# Altium PCB ECE362_BuckV2.PcbDoc (part 1 of 2)
Units mm, origin at the board's own origin, x right, y up, seen from the top; angles counter-clockwise.
Board outline 100 x 80 mm, 4 copper layers (Top Layer, GND, Power, Bottom Layer), stack 1.586 mm thick; 122 components, 85 nets, 403 pads, 248 vias.
Unrouted connection lines stored in the file: 1.
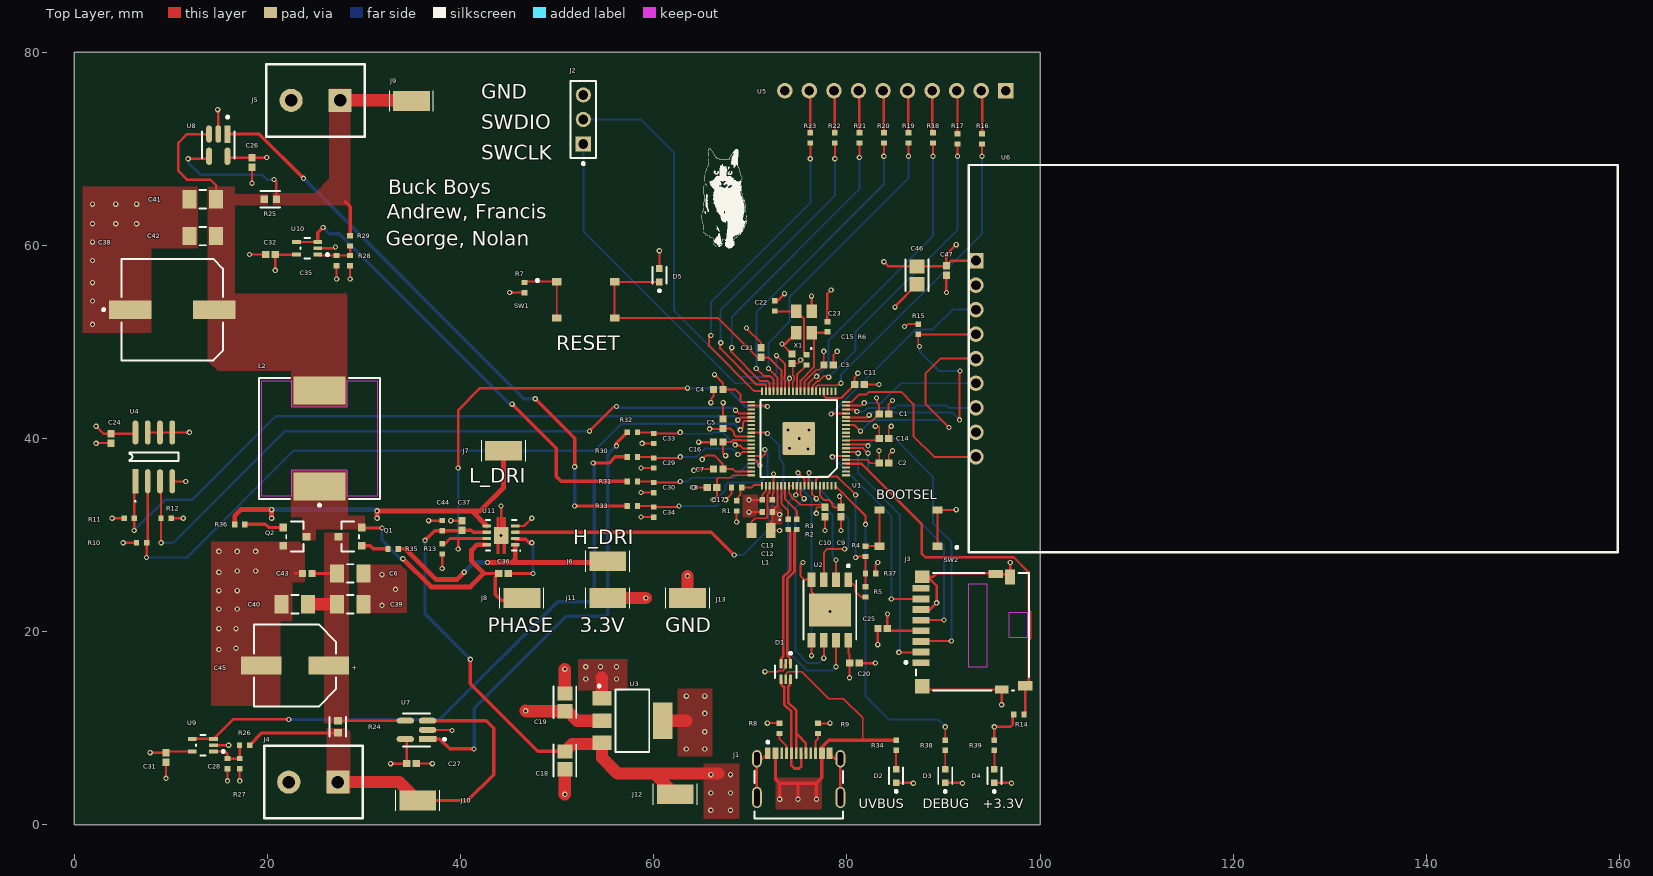
[diagram p0: Top Layer view]
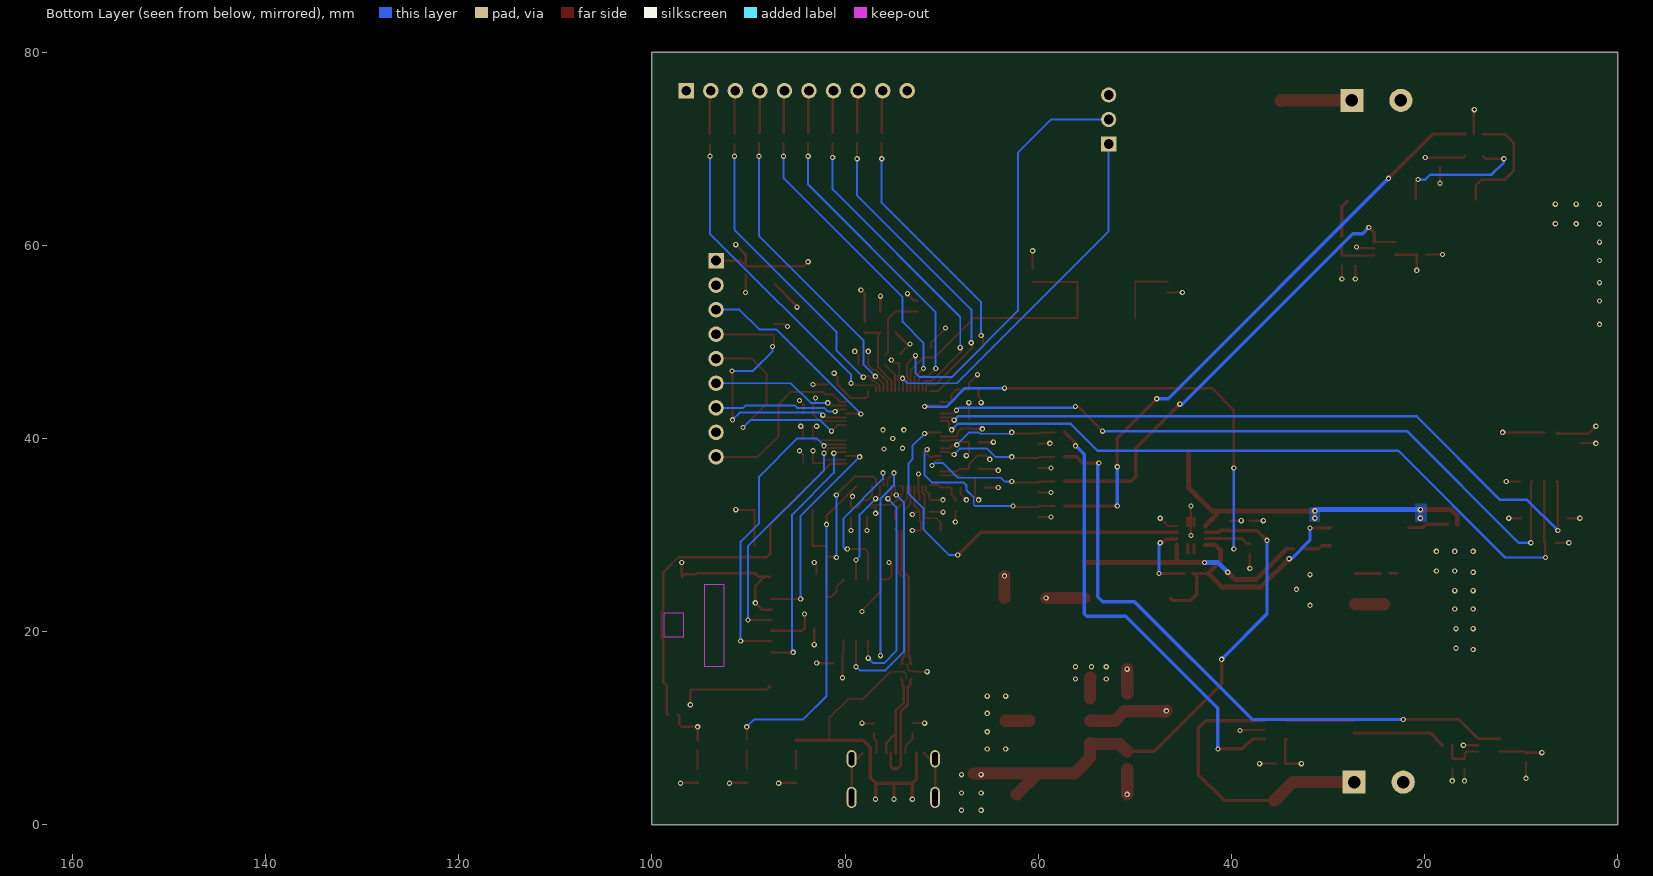
[diagram p1: Bottom Layer view, seen from below]
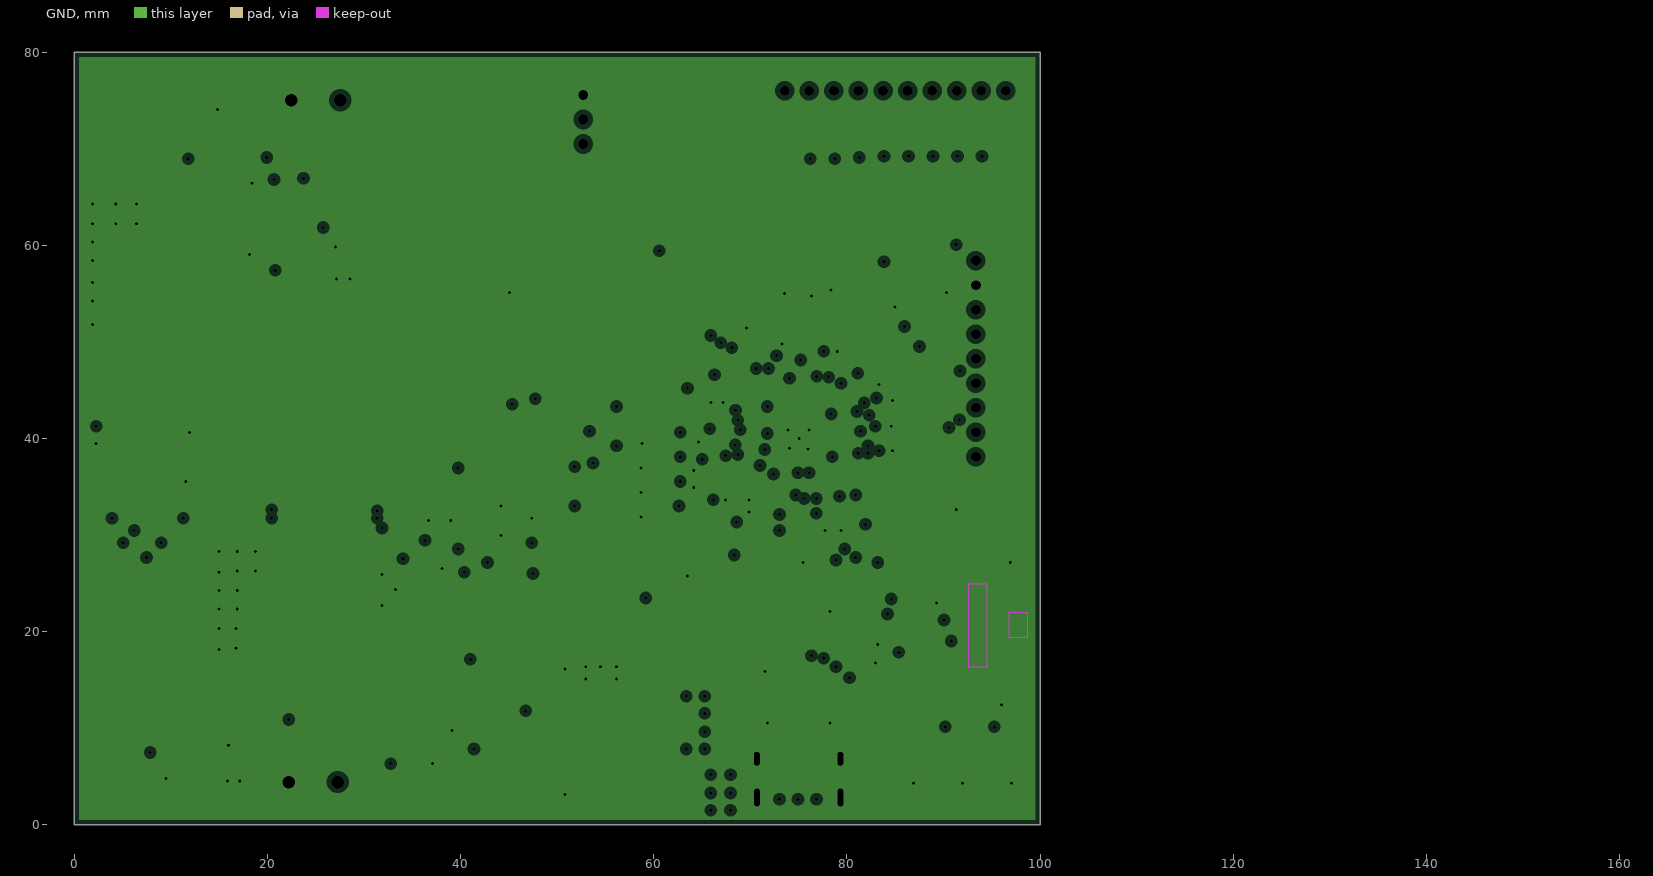
[diagram p2: GND, clearances drawn from the general rule]
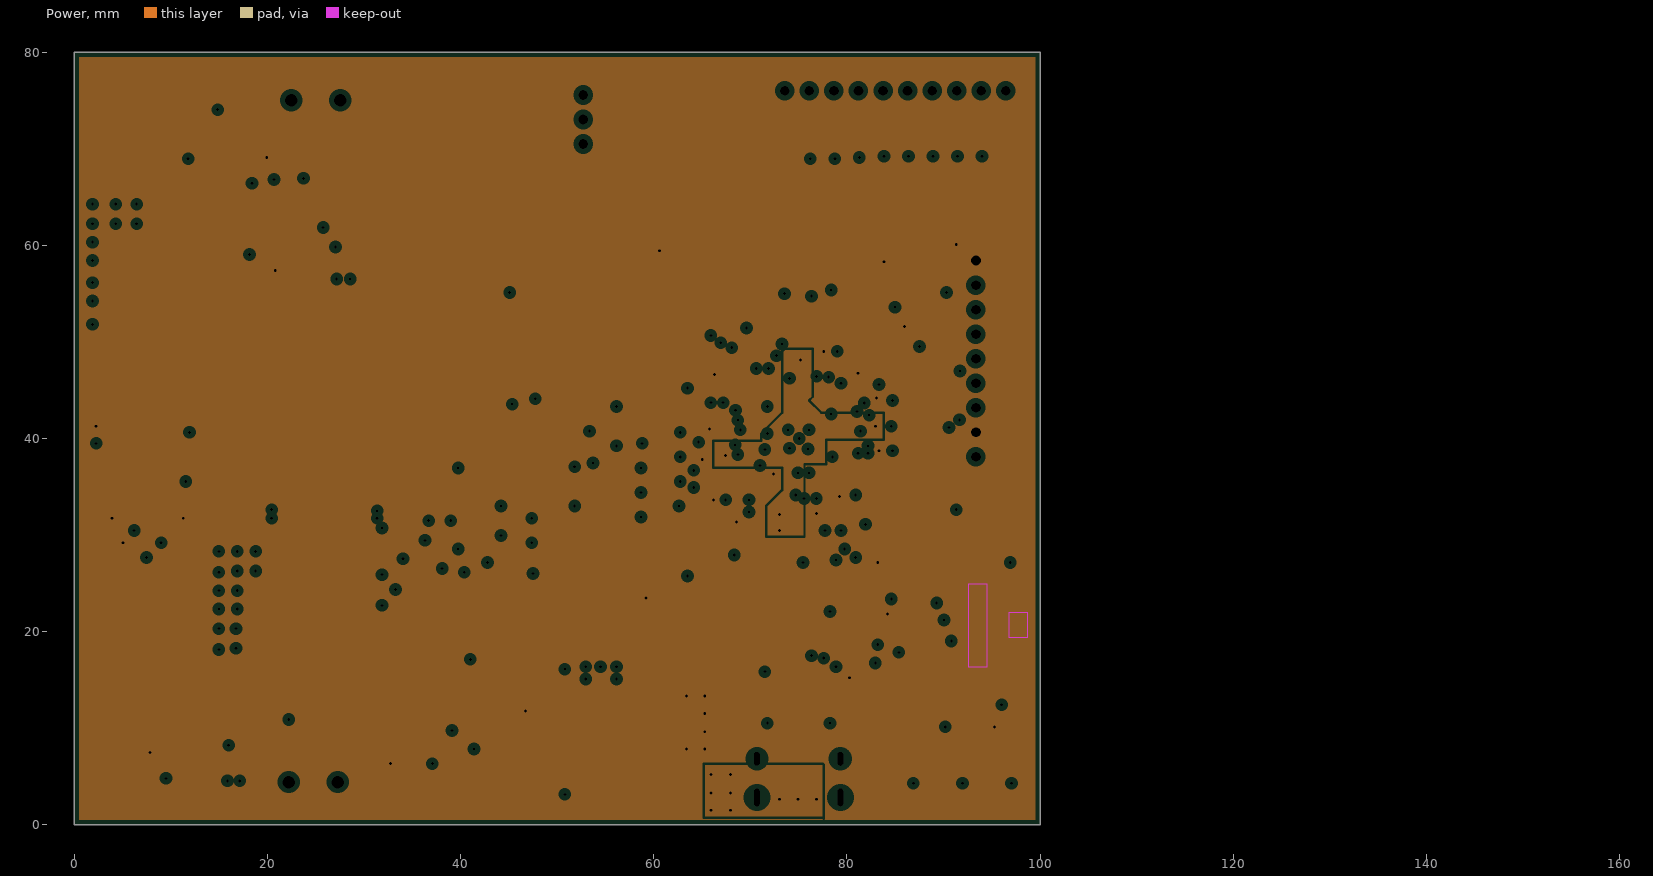
[diagram p3: Power, clearances drawn from the general rule]

## Layer stack, top to bottom
Top Solder: solder mask 0.0102, Solder Resist, Dk 3.5
Top Layer: signal copper 0.035
Dielectric 2: prepreg 0.2104, PP-006, Dk 4.4
GND: plane copper 0.0152, net GND
Dielectric 1: dielectric 1.065, FR-4, Dk 4.6
Power: plane copper 0.0152, net (Multiple Nets)
Dielectric 3: prepreg 0.2104, PP-006, Dk 4.4
Bottom Layer: signal copper 0.035
Bottom Solder: solder mask 0.0102, Solder Resist, Dk 3.5

## Board outline
0,0 0,80 100,80 100,0

## Design rules (kind name [scope] priority, off if disabled: settings)
Clearance [All] p1: gap=0.127 ignorepadtopadclearanceinfootprint=FALSE
ComponentClearance [All] p1: gap=0.127 collisioncheckmode=3 verticalgap=0.127 showdistances=FALSE
DiffPairsRouting [All] p1: maxlimit=0.152 minlimit=0.152 mostfreqgap=0.152 toplayer_minwidth=0.272 toplayer_maxwidth=0.272 toplayer_prefwidth=0.272 bottomlayer_minwidth=0.272 bottomlayer_maxwidth=0.272 bottomlayer_prefwidth=0.272 impedanceprofiledriven=TRUE impedanceprofileid={1B2B121F-581C-4ED9-ADDA-F08EA2B8F4BE} impedanceprofilevalue=90.000000 maxuncoupledlength=12.7
MinimumSolderMaskSliver [All] p1: minsoldermaskwidth=0
PlaneClearance [All] p1: clearance=0.508
PlaneConnect [All] p1: planeconnectstyle=Relief reliefexpansion=0.508 reliefentries=4 reliefconductorwidth=0.254 reliefairgap=0.254
PolygonConnect [All] p1: connectstyle=Direct reliefconductorwidth=0.254 reliefentries=4 polygonreliefangle="90 Angle" airgapwidth=0.254
RoutingVias [All] p1: holewidth=0.3 width=0.55 viastyle="Through Hole" minholewidth=0.3 minwidth=0.55 maxholewidth=0.3 maxwidth=0.55
SilkToSilkClearance [All] p1: silktosilkclearance=0
SilkToSolderMaskClearance [IsPad] p1: minsilkscreentomaskgap=0.127 clearancetoexposedcopper=TRUE
SolderMaskExpansion [All] p1: expansion=0 istentingtop=FALSE
SupplyNets "Schematic Supply Nets_5" [InNet('VOUT')] p1: voltage=0.000
SupplyNets "Schematic Supply Nets_4" [InNet('+1.1V')] p2: voltage=0.000
SupplyNets "Schematic Supply Nets_3" [InNet('VIN')] p3: voltage=0.000
SupplyNets "Schematic Supply Nets_2" [InNet('+3.3V')] p4: voltage=0.000
SupplyNets "Schematic Supply Nets_1" [InNet('GND')] p5: voltage=0.000
SupplyNets "Schematic Supply Nets" [InNet('UVBUS')] p6: voltage=0.000
Width [All] p1: maxlimit=1.27 minlimit=0.152 preferedwidth=0.203 minimp=50.000000 maximp=50.000000 favimp=50.000000
23 further rules are at their usual default settings.

## Classes and differential pairs
net class Power: 3.3V_AVDD +1.1V +3.3V NetC6_2 NetC38_2 PHASE VIN VOUT
component class S6: C20 C24 C25 C46 C47 J3 R5 R10 R11 R12 R14 R15 R37 U2 U4 U6
component class S5: C6 C26 C27 C28 C29 C30 C31 C32 C33 C34 C35 C36 C37 C38 C39 C40 C41 C42 C43 C44 C45 J4 J5 J6 J7 J8 J9 J10 L2 Q1 Q2 R13 R24 R25 R26 R27 R28 R29 R30 R31 R32 R33 R35 R36 U7 U8 U9 U10 U11
component class S4: C1 C2 C3 C4 C5 C7 C8 C9 C10 C11 C14 C15 C16 C18 C19 U3
component class S3: R16 R17 R18 R19 R20 R21 R22 R23 U5
component class S2: D1 D2 D3 D4 D5 J1 J2 J11 J12 J13 R4 R7 R8 R9 R34 R38 R39 SW1 SW2
component class S1: C12 C13 C17 C21 C22 C23 L1 R1 R2 R3 R6 U1 X1
differential pair USB_DX: +USB_DX_P -USB_DX_N
differential pair USB_D: +USB_D_P -USB_D_N

## Components (designator, comment, footprint, x,y, rotation, side; value= is the part's Value field where it differs from the comment)
C1 "CL05B104KO5NNNC" CAPC1050X55X23ML05T13 83.82,42.545 r180 top
C2 "CL05B104KO5NNNC" CAPC1050X55X23ML05T13 83.82,37.465 r180 top
C3 "CL05B104KO5NNNC" CAPC1050X55X23ML05T13 78.105,47.625 r180 top
C4 "CL05B104KO5NNNC" CAPC1050X55X23ML05T13 66.675,45.085 r0 top
C5 "CL05B104KO5NNNC" CAPC1050X55X23ML05T13 67.183,41.529 r270 top
C6 "GRM31CC81E226ME11L" FP-GRM31C-0_3-e0_3_0_8-IPC_B 28.575,26.035 r180 top
C7 "CL05B104KO5NNNC" CAPC1050X55X23ML05T13 66.675,36.83 r0 top
C8 "CL05B104KO5NNNC" CAPC1050X55X23ML05T13 66.04,34.925 r0 top
C9 "CL05B104KO5NNNC" CAPC1050X55X23ML05T13 79.375,32.385 r90 top
C10 "CL05B104KO5NNNC" CAPC1050X55X23ML05T13 77.724,32.385 r90 top
C11 "CL05B104KO5NNNC" CAPC1050X55X23ML05T13 81.28,45.593 r180 top
C12 "4.7uF" "0402 Resistor" 71.755,32.385 r0 top
C13 "4.7uF" "0402 Resistor" 71.755,33.655 r0 top
C14 "CL05B104KO5NNNC" CAPC1050X55X23ML05T13 83.82,40.005 r180 top
C15 "CL05B104KO5NNNC" CAPC1050X55X23ML05T13 74.295,48.26 r270 top
C16 "CL05B104KO5NNNC" CAPC1050X55X23ML05T13 66.675,39.624 r0 top
C17 "4.7uF" "0402 Resistor" 68.58,34.925 r0 top
C18 "CL21A106KAYNNNE" FP-CL21-IPC_A 50.8,6.694 r270 top
C19 "CL21A106KAYNNNE" FP-CL21-IPC_A 50.8,12.7 r90 top
C20 "CL05B104KO5NNNC" CAPC1050X55X23ML05T13 80.772,16.764 r180 top
C21 "CL05B104KO5NNNC" CAPC1050X55X23ML05T13 71.12,48.895 r270 top
C22 "CL05C150JB5NNNC" "0402 Resistor" 72.517,53.721 r270 top
C23 "CL05C150JB5NNNC" "0402 Resistor" 77.978,51.562 r270 top
C24 "CL05B104KO5NNNC" CAPC1050X55X23ML05T13 3.81,40.005 r90 top
C25 "CL05B104KO5NNNC" CAPC1050X55X23ML05T13 83.693,20.32 r0 top
C26 "CL05B104KO5NNNC" CAPC1050X55X23ML05T13 18.415,68.58 r90 top
C27 "CL05B104KO5NNNC" CAPC1050X55X23ML05T13 34.925,6.35 r180 top
C28 "CC0402KRX7R6BB222" "0402 Resistor" 15.875,6.35 r90 top
C29 "CC0402KRX7R6BB222" "0402 Resistor" 60,37.465 r90 top
C30 "CC0402KRX7R6BB222" "0402 Resistor" 60,34.925 r90 top
C31 "CL05B104KO5NNNC" CAPC1050X55X23ML05T13 9.525,6.985 r90 top
C32 "CL05B104KO5NNNC" CAPC1050X55X23ML05T13 20.32,59.055 r0 top
C33 "CC0402KRX7R6BB222" "0402 Resistor" 60,40.005 r90 top
C34 "CC0402KRX7R6BB222" "0402 Resistor" 60,32.385 r90 top
C35 "CC0402KRX7R6BB222" "0402 Resistor" 27.178,58.42 r90 top
C36 "CL05B104KO5NNNC" CAPC1050X55X23ML05T13 44.45,26.035 r180 top
C37 "CL05B104KO5NNNC" CAPC1050X55X23ML05T13 40.132,30.988 r270 top
C38 "6SVPA470M" FP-OS-CON-SMT-F8-MFG 10.16,53.34 r0 top
C39 "GRM31CC81E226ME11L" FP-GRM31C-0_3-e0_3_0_8-IPC_B 28.575,22.86 r180 top
C40 "GRM31CC81E226ME11L" FP-GRM31C-0_3-e0_3_0_8-IPC_B 22.86,22.86 r0 top
C41 "GRM31CC81E226ME11L" FP-GRM31C-0_3-e0_3_0_8-IPC_B 13.335,64.77 r0 top
C42 "GRM31CC81E226ME11L" FP-GRM31C-0_3-e0_3_0_8-IPC_B 13.335,60.96 r0 top
C43 "CL05B104KO5NNNC" CAPC1050X55X23ML05T13 24.13,26.035 r0 top
C44 "4.7uF" "0402 Resistor" 38.1,30.988 r270 top
C45 "865060653010" WCAP-ASLL_D8H10.5 22.86,16.51 r0 top
C46 "CL21A106KAYNNNE" FP-CL21-IPC_A 87.249,56.896 r270 top
C47 "CL05B104KO5NNNC" CAPC1050X55X23ML05T13 90.297,57.404 r90 top
D1 "USBLC6-2P6" FP-SOT-666-MFG 73.66,15.875 r270 top
D2 "LSM0603453V" FP-LSM0603453V-MFG 85.09,5.08 r90 top
D3 "LSM0603453V" FP-LSM0603453V-MFG 90.17,5.08 r90 top
D4 "LSM0603453V" FP-LSM0603453V-MFG 95.25,5.08 r90 top
D5 "LSM0603453V" FP-LSM0603453V-MFG 60.579,56.896 r90 top
J1 "217179-0001" FP-2171790001-MFG 75,4 r0 top
J2 "TSW-103-22-G-S" FP-TSW-103-22-G-S-MFG 52.705,73.025 r90 top
J3 "1140084168" FP-1140084168-0 93,20 r270 top
J4 "DG127-5.08-02P-14-02A(H)" "DEGSON DG127-5.08-02P-14-02A(H)" 24.765,4.445 r180 top
J5 "DG127-5.08-02P-14-02A(H)" "DEGSON DG127-5.08-02P-14-02A(H)" 25,75 r180 top
J6 "5019" 5019_MFG 55.245,27.305 r0 top
J7 "5019" 5019_MFG 44.45,38.735 r0 top
J8 "5019" 5019_MFG 46.355,23.495 r0 top
J9 "5019" 5019_MFG 34.925,74.93 r0 top
J10 "5019" 5019_MFG 35.56,2.54 r0 top
J11 "5019" 5019_MFG 55.245,23.495 r0 top
J12 "5019" 5019_MFG 62.23,3.175 r0 top
J13 "5019" 5019_MFG 63.5,23.495 r0 top
L1 "AOTA-B201610S3R3-101-T" AOTA-B201610S3R3-101-T 71.12,30.48 r0 top
L2 "7447709221" WE-PD_1210 25.4,40.005 r0 top
Q1 "AO3400A" FP-SOT23-MFG 28.575,29.845 r180 top
Q2 "AO3400A" FP-SOT23-MFG 22.86,29.845 r0 top
R1 "33R" "0402 Resistor" 68.58,33.02 r270 top
R2 "FRC0402F27R0TS" "0402 Resistor" 74.803,31.115 r270 top
R3 "FRC0402F27R0TS" "0402 Resistor" 73.914,31.115 r270 top
R4 "FRC0402F1001TS" "0402 Resistor" 81.915,28.321 r270 top
R5 "FRC0402F0000TS" "0402 Resistor" 81.915,24.13 r90 top
R6 "FRC0402F1001TS" "0402 Resistor" 75.819,48.133 r270 top
R7 "FRC0402F1001TS" "0402 Resistor" 46.609,55.626 r90 top
R8 "FRC0402F5101TS" "0402 Resistor" 73,10 r90 top
R9 "FRC0402F5101TS" "0402 Resistor" 77,10 r90 top
R10 "FRC0402F4701TS" "0402 Resistor" 6.985,29.21 r180 top
R11 "FRC0402F4701TS" "0402 Resistor" 5.715,31.75 r180 top
R12 "FRC0402F1002TS" "0402 Resistor" 9.525,31.75 r0 top
R13 "FRC0402F3302TS" "0402 Resistor" 38.1,28.575 r90 top
R14 "FRC0402F1002TS" "0402 Resistor" 97.79,11.43 r0 top
R15 "FRC0402F1002TS" "0402 Resistor" 87.376,51.308 r90 top
R16 "FRC0402F1001TS" "0402 Resistor" 93.98,71.01 r270 top
R17 "FRC0402F1001TS" "0402 Resistor" 91.44,71.01 r270 top
R18 "FRC0402F1001TS" "0402 Resistor" 88.9,71.12 r270 top
R19 "FRC0402F1001TS" "0402 Resistor" 86.36,71.12 r270 top
R20 "FRC0402F1001TS" "0402 Resistor" 83.82,71.12 r270 top
R21 "FRC0402F1001TS" "0402 Resistor" 81.28,71.12 r270 top
R22 "FRC0402F1001TS" "0402 Resistor" 78.74,71.12 r270 top
R23 "FRC0402F1001TS" "0402 Resistor" 76.2,71.12 r270 top
R24 "CSR0603FK20L0" FP-CSR0603-IPC_C 27.305,10.16 r90 top
R25 "CSR0603FK20L0" FP-CSR0603-IPC_C 20.32,64.77 r0 top
R26 "FRC0402F1003TS" "0402 Resistor" 17.653,8.255 r180 top
R27 "FRC0402F3302TS" "0402 Resistor" 17.145,6.35 r90 top
R28 "FRC0402F3302TS" "0402 Resistor" 28.575,58.42 r90 top
R29 "FRC0402F2202TS" "0402 Resistor" 28.575,60.452 r90 top
R30 "FRC0402F1000TS" "0402 Resistor" 57.785,38.1 r0 top
R31 "FRC0402F1000TS" "0402 Resistor" 57.785,35.56 r0 top
R32 "FRC0402F1000TS" "0402 Resistor" 57.785,40.64 r0 top
R33 "FRC0402F1000TS" "0402 Resistor" 57.785,33.02 r0 top
R34 "FRC0402F1001TS" "0402 Resistor" 85.09,8.255 r90 top
R35 "FRC0402F0000TS" "0402 Resistor" 33.02,28.575 r0 top
R36 "FRC0402F0000TS" "0402 Resistor" 17.145,31.115 r180 top
R37 "FRC0402F1002TS" "0402 Resistor" 82.44,26.035 r0 top
R38 "FRC0402F1001TS" "0402 Resistor" 90.17,8.255 r90 top
R39 "FRC0402F1001TS" "0402 Resistor" 95.25,8.255 r90 top
SW1 "XKB Connection TS-1187A-B-A-B" Push_Button 52.959,54.356 r0 top
SW2 "XKB Connection TS-1187A-B-A-B" Push_Button 86.36,30.734 r180 top
U1 "RP2350B" QFN-80 75,40 r180 top locked
U2 "W25Q64JVZPIQ" FP-ZP-MFG 78.232,22.25 r270 top
U3 "NCP1117ST33T3G" ONSC-SOT-223-4-318H-01_A_V 57.785,10.795 r0 top
U4 "TMP75CQDRQ1" TMP75CQDRQ1 8.255,38.1 r90 top
U5 "ECE 362 Keypad" "ECE 362 Keypad" 85,76 r180 top
U6 "2.2 TFT SPI 240X320" "TFT 2.2 LCD Display" 93.345,48.26 r270 top
U7 "INA180A1IDBVR" FP-DBV0005A-IPC_A 35.44,9.845 r180 top
U8 "INA180A3IDBVR" FP-DBV0005A-IPC_A 14.92,70.365 r270 top
U9 "TLV9001IDCKR" FP-DCK0005A-MFG 13.335,8.255 r180 top
U10 "TLV9001IDCKR" FP-DCK0005A-MFG 24.13,59.69 r180 top
U11 "TPS28225DRBR" DRB0008A_V 44.196,29.972 r180 top
X1 "12MHz" "ABRACON ABM8-272-T3" 75.565,52.07 r90 top

## Footprints (in the part's own frame and the unit in brackets; to place one, negate y for a bottom-side part, rotate by r counter-clockwise, add the part's x,y. Pads: shape width x height; smd on the part's side, far side on the other; paste and mask are expansions set on the pad)
"0402 Resistor" [mm] "0402 Thick Film"
  rect 0.55x0.6 smd mask+0.05: 1(-0.525,0) 2(0.525,0)
5019_MFG [mm] "Recommended Land Pattern"
  rect 3.8x2.03 smd paste+0 mask+0: 1(0,0)
  silkscreen extent -2.27,-1.08 2.27,1.08, body extent -1.91,-1.01 1.91,1.01, height 2.42
"ABRACON ABM8-272-T3" [mm] "Ultra Miniature Ceramic SMD Crystal"
  rect 1.4x1.1 smd mask+0.05: 1(-1.1,-0.8) 2(1.1,-0.8) 3(1.1,0.8) 4(-1.1,0.8)
  silkscreen extent -2.76,-0.76 -2.74,-0.74
AOTA-B201610S3R3-101-T [mm] "3.3uH Inductor for the RP2350"
  rect 1x1.6 smd mask+0.05: 1(1,0) 2(-1,0)
  silkscreen extent 1.9,1.1 1.9,1.1
CAPC1050X55X23ML05T13 [mm] "Chip Capacitor, 2-Leads, Body 1.05x0.55mm, IPC Low Density"
  rect 0.76x0.72 smd: 1(-0.49,0) 2(0.49,0)
  body extent -0.53,-0.28 0.53,0.27, height 0.55
"DEGSON DG127-5.08-02P-14-02A(H)" [mm]
  rect 2.4x2.4 hole 1.3 mask+0.05: 1(-2.54,0)
  round 2.4 hole 1.3 mask+0.05: 2(2.54,0)
  silkscreen extent -5.1,-3.75 5.1,3.75
DRB0008A_V [mm] "SON, 8-Leads, Body 3x3mm, Pitch 0.65mm, Thermal Pad 1.50 x 3.8mm"
  rrect29% 0.85x0.35 smd: 1(-1.475,0.975) 2(-1.475,0.325) 3(-1.475,-0.325) 4(-1.475,-0.975) 5(1.475,-0.975) 6(1.475,-0.325) 7(1.475,0.325) 8(1.475,0.975)
  rrect7% 1.5x1.75 smd: 9(0,0)
  Top Layer region: 0.185,0.875 0.185,1.9 0.465,1.9 0.465,0.875
  Top Layer region: -0.185,-0.875 -0.185,-1.9 -0.465,-1.9 -0.465,-0.875
  Top Layer region: 0.185,-0.875 0.185,-1.9 0.465,-1.9 0.465,-0.875
  Top Layer region: -0.185,0.875 -0.185,1.9 -0.465,1.9 -0.465,0.875
  silkscreen extent -2.02,-1.58 1.57,1.62, body extent -1.5,-1.5 1.5,1.5, height 1
"ECE 362 Keypad" [mm]
  rect 1.6x1.6 hole 1 mask+0.05: 1(-11.43,0)
  round 1.6 hole 1 mask+0.05: 2(-8.89,0) 3(-6.35,0) 4(-3.81,0) 5(-1.27,0) 6(1.27,0) 7(3.81,0) 8(6.35,0) 9(8.89,0) 10(11.43,0)
FP-1140084168-0 [mm]
  rect 0.7x1.75 smd paste+0 mask+0: 1(3.2,-5.35) 2(2.1,-5.35) 3(1,-5.35) 4(-0.1,-5.35) 5(-1.2,-5.35) 6(-2.3,-5.35) 7(-3.4,-5.35) 8(-4.5,-5.35)
  rect 1x1.55 smd paste+0 mask+0: 9(5.575,5.45)
  rect 1.55x1 smd paste+0 mask+0: 10(-5.675,3.875)
  rect 0.8x1.4 smd paste+0 mask+0: 11(5.975,3.025)
  rect 0.8x1.5 smd paste+0 mask+0: 12(-5.975,2.375)
  rect 1.3x1.5 smd paste+0 mask+0: 13(-5.7,-5.225)
  rect 1.5x1.5 smd paste+0 mask+0: 14(5.65,-5.225)
  Keep-Out Layer region: -1.951,3.725 0.549,3.725 0.549,5.725 -1.951,5.725
  Keep-Out Layer region: -4.9,-0.475 3.6,-0.475 3.6,1.525 -4.9,1.525
  silkscreen extent -6.1,-7.02 6.1,5.85, body extent -6.55,-6.32 6.5,6.32, height 0.25
FP-2171790001-MFG [mm]
  rrect100% 1x1.8 hole 1.4 slot 0.6 at 0 deg paste-2539.97 mask+0: 1(-4.32,2.85) 2(4.32,2.85)
  rrect100% 1x2.2 hole 1.8 slot 0.6 at 0 deg paste-2539.97 mask+0: 3(-4.32,-1.15) 4(4.32,-1.15)
  rect 0.6x1.15 smd paste+0 mask+0: A1-B12(-3.2,3.425) A4-B9(-2.4,3.425) B1-A12(3.2,3.425) B4-A9(2.4,3.425)
  rect 0.3x1.15 smd paste+0 mask+0: A5(-1.25,3.425) A6(-0.25,3.425) A7(0.25,3.425) A8(1.25,3.425) B5(1.75,3.425) B6(0.75,3.425) B7(-0.75,3.425) B8(-1.75,3.425)
  silkscreen extent -4.57,-3.35 4.57,4.7, body extent -4.92,-3.45 4.92,4.1, height 0.25
FP-CL21-IPC_A [mm]
  rect 1.455x1.556 smd paste+0 mask+0: 1(-0.926,0) 2(0.926,0)
  silkscreen extent -1.65,-1.18 1.65,1.18, body extent -2.15,-1.28 2.15,1.28, height 0.25
FP-CSR0603-IPC_C [mm]
  rect 0.758x0.812 smd paste+0 mask+0: 1(-0.627,0) 2(0.627,0)
  silkscreen extent -1.01,-0.85 1.01,0.85, body extent -1.11,-0.55 1.11,0.55, height 0.25
FP-DBV0005A-IPC_A [mm]
  rect 1.805x0.612 smd paste+0 mask+0: 1(-1.15,0.95)
  rrect100% 1.805x0.612 smd paste+0 mask+0: 2(-1.15,0) 3(-1.15,-0.95) 4(1.15,-0.95) 5(1.15,0.95)
  silkscreen extent -3.03,-1.7 1.4,1.7, body extent -2.55,-1.95 2.55,1.95, height 0.25
FP-DCK0005A-MFG [mm]
  rect 0.9x0.4 smd paste-1000 mask+0: 1(-1.1,0.65) 2(-1.1,0) 3(-1.1,-0.65) 4(1.1,-0.65) 5(1.1,0.65)
  silkscreen extent -2.23,-1.07 0.7,1.07, body extent -1.65,-1.33 1.65,1.33, height 0.25
FP-GRM31C-0_3-e0_3_0_8-IPC_B [mm]
  rect 1.453x1.904 smd paste+0 mask+0: 1(-1.375,0) 2(1.375,0)
  silkscreen extent -0.35,-0.95 0.35,0.95, body extent -2.35,-1.2 2.35,1.2, height 0.25
FP-LSM0603453V-MFG [mm]
  rect 0.7x0.7 smd paste+0 mask+0: 1(-0.7,0) 2(0.7,0)
  silkscreen extent -1.72,-0.72 0.85,0.72, body extent -1.15,-0.55 1.15,0.55, height 0.25
FP-OS-CON-SMT-F8-MFG [mm]
  rect 4.4x1.9 smd paste+0 mask+0: 1(-4.35,0) 2(4.35,0)
  silkscreen extent -7.22,-5.25 5.25,5.25, body extent -6.8,-5.5 6.8,5.5, height 0.25
FP-SOT23-MFG [mm]
  rect 0.8x0.8 smd paste+0 mask+0: 1(-1.2,0.95) 2(-1.2,-0.95) 3(1.2,0)
  silkscreen extent -0.9,-1.55 0.9,1.55, body extent -1.7,-1.78 1.7,1.78, height 0.25
FP-SOT-666-MFG [mm]
  rect 0.99x0.3 smd paste+0 mask+0: 1(-0.805,0.5) 2(-0.805,0) 3(-0.805,-0.5) 4(0.805,-0.5) 5(0.805,0) 6(0.805,0.5)
  silkscreen extent -2.02,-1.1 0.65,1.1, body extent -1.4,-0.95 1.4,0.95, height 0.25
FP-TSW-103-22-G-S-MFG [mm]
  rect 1.57x1.57 hole 1.02 paste-2539.97 mask+0: 1(-2.54,0)
  round 1.57 hole 1.02 paste-2539.97 mask+0: 2(0,0) 3(2.54,0)
  silkscreen extent -4.7,-1.34 4,1.34, body extent -4.1,-1.44 4.1,1.44, height 0.25
FP-ZP-MFG [mm]
  rect 1.5x0.8 smd paste-1000 mask+0: 1(-3.15,1.905) 2(-3.15,0.635) 3(-3.15,-0.635) 4(-3.15,-1.905) 5(3.15,-1.905) 6(3.15,-0.635) 7(3.15,0.635) 8(3.15,1.905)
  rect 3.45x4.35 smd paste+0 mask+0: 9(0,0)
  silkscreen extent -4.7,-2.73 3.05,2.73, body extent -4,-2.65 4,2.65, height 0.25
ONSC-SOT-223-4-318H-01_A_V [mm] "SOT223, 4-Leads, Body 6.5x3.5mm, Pitch 2.3mm"
  rect 2x1.5 smd: 1(-3.15,2.3) 2(-3.15,0) 3(-3.15,-2.3)
  rect 2x3.8 smd: 4(3.15,0)
  silkscreen extent -3.55,-3.25 1.75,3.72, body extent -1.75,-3.25 1.75,3.25, height 1.8
Push_Button [mm] "XKB Connection TS-1187A-B-A-B"
  rect 1x0.75 smd: 1(-3,1.875) 2(3,1.875) 3(-3,-1.875) 4(3,-1.875)
  silkscreen extent -5.13,1.87 -4.87,2.13
QFN-80 [mm]
  rect 0.78x0.22 smd mask+0.05: 1(-4.897,3.8) 2(-4.897,3.4) 3(-4.897,3) 4(-4.897,2.6) 5(-4.897,2.2) 6(-4.897,1.8) 7(-4.897,1.4) 8(-4.897,1) 9(-4.897,0.6) 10(-4.897,0.2) 11(-4.897,-0.2) 12(-4.897,-0.6) 13(-4.897,-1) 14(-4.897,-1.4) 15(-4.897,-1.8) 16(-4.897,-2.2) 17(-4.897,-2.6) 18(-4.897,-3) 19(-4.897,-3.4) 20(-4.897,-3.8) 41(4.897,-3.8) 42(4.897,-3.4) 43(4.897,-3) 44(4.897,-2.6) 45(4.897,-2.2) 46(4.897,-1.8) 47(4.897,-1.4) 48(4.897,-1) 49(4.897,-0.6) 50(4.897,-0.2) 51(4.897,0.2) 52(4.897,0.6) 53(4.897,1) 54(4.897,1.4) 55(4.897,1.8) 56(4.897,2.2) 57(4.897,2.6) 58(4.897,3) 59(4.897,3.4) 60(4.897,3.8)
  rect 0.22x0.78 smd mask+0.05: 21(-3.8,-4.897) 22(-3.4,-4.897) 23(-3,-4.897) 24(-2.6,-4.897) 25(-2.2,-4.897) 26(-1.8,-4.897) 27(-1.4,-4.897) 28(-1,-4.897) 29(-0.6,-4.897) 30(-0.2,-4.897) 31(0.2,-4.897) 32(0.6,-4.897) 33(1,-4.897) 34(1.4,-4.897) 35(1.8,-4.897) 36(2.2,-4.897) 37(2.6,-4.897) 38(3,-4.897) 39(3.4,-4.897) 40(3.8,-4.897) 61(3.8,4.897) 62(3.4,4.897) 63(3,4.897) 64(2.6,4.897) 65(2.2,4.897) 66(1.8,4.897) 67(1.4,4.897) 68(1,4.897) 69(0.6,4.897) 70(0.2,4.897) 71(-0.2,4.897) 72(-0.6,4.897) 73(-1,4.897) 74(-1.4,4.897) 75(-1.8,4.897) 76(-2.2,4.897) 77(-2.6,4.897) 78(-3,4.897) 79(-3.4,4.897) 80(-3.8,4.897)
  rrect10% 3.4x3.4 smd mask+0.05: 81(0,0)
  silkscreen extent -3.97,-3.97 3.97,3.97
"TFT 2.2 LCD Display" [mm]
  rect 1.6x1.6 hole 1 mask+0.05: 1(-10.16,0)
  round 1.6 hole 1 mask+0.05: 2(-7.62,0) 3(-5.08,0) 4(-2.54,0) 5(0,0) 6(2.54,0) 7(5.08,0) 8(7.62,0) 9(10.16,0)
  silkscreen extent -20.05,-0.75 20.05,66.45
TMP75CQDRQ1 [mm] "-40℃~+125℃ SMBus ±0.25℃ SOP-8 Analog and Digital Output"
  rect 2.5x0.6 smd mask+0.05: 1(-2.525,1.905)
  oval 2.5x0.6 smd mask+0.05: 2(-2.525,0.635) 3(-2.525,-0.635) 4(-2.525,-1.905) 5(2.525,-1.905) 6(2.525,-0.635) 7(2.525,0.635) 8(2.525,1.905)
  silkscreen extent -4.6,-2.54 0.44,2.54
WCAP-ASLL_D8H10.5 [mm] "Aluminium Electrolytic V-Chip SMT Capacitors, 8x10.5mm"
  rect 4.2x1.9 smd: 1(3.5,0) 2(-3.5,0)
  silkscreen extent -4.25,-4.25 4.25,4.25, body extent -4.5,-4.15 4.5,4.15, height 10.5
WE-PD_1210 [mm] "SMT Shielded Power Inductor, 2-leads, body 12x12mm"
  rect 5.4x2.9 smd: 1(0,-4.95) 2(0,4.95)
  Top Layer keep-out region: -6,6 -2.9,6 -2.9,3.3 2.9,3.3 2.9,6 6,6 6,-6 2.9,-6 2.9,-3.3 -2.9,-3.3 -2.9,-6 -6,-6
  silkscreen extent -6.25,-7.02 6.25,6.25, body extent -6,-6 6,6, height 9.46

## Part data
C1 C2 C3 C4 C5 C7 C8 C9 C10 C11 C14 C15 C16 C20 C21 C24 C25 C26 C27 C31 C32 C36 C37 C43 C47: library part CMP-2000-05439-1, "Chip Capacitor, 100 nF, +/- 10%, 16 V, -55 to 125 degC, 0402 (1005 Metric), RoHS, Tape and Reel", Capacitance=100nF, Case Size/Dimension=0402, Dielectric=X7R, LCSC Part #=C1525, Manufacturer="Samsung Electro-Mechanics", Rated Voltage=16V, Tolerance (%)=±10%, Datasheet=https://www.lcsc.com/datasheet/C1525.pdf, Datasheet URL=https://datasheet.ciiva.com/29198/458718-da-01-en-vs-kondensator-0402-29198423.pdf, Datasheet Version=Nov-10, Manufacturer URL=http://www.samsungsem.com/global/index.jsp
C6 C39 C40 C41 C42: library part CMP-06035-043516-1, "Chip Multilayer Ceramic Capacitors for General Purpose, 1206, 22uF, X6S, 22%, 20%, 25V", Capacitance=22uF, Dielectric=X6S, Tolerance=20%, Voltage Rating (DC)=25V, Length=3.2mm, Thickness=1.6mm, Width=1.6mm
C12 C13 C17 C44: library part CL05A475MP5NRNC, "CAP CER 4.7uF 10V X5R 0402", LCSC Part #=C23733, C=4.7uF, Datasheet=https://www.lcsc.com/datasheet/C23733.pdf
C18 C19 C46: library part CMP-13271-002975-1, "CL21 Series 0805 10uF 25V ±10% Tolerance X5R Multilayer Ceramic Chip Capacitor", Capacitance=10uF, Case Code (Imperial)=0805, Case Code (Metric)=2012, Dielectric=X5R, LCSC Part #=C15850, Max Operating Temperature=85°C, Min Operating Temperature=-55°C, Package Quantity=1, Tolerance=10%, Voltage Rating=25V, Case/Package=0805, Datasheet=https://www.lcsc.com/datasheet/C15850.pdf, Depth=1.25mm, Height=1.25mm, Length=2mm, Mount="Surface Mount", Packaging="Tape and Reel", Radiation Hardening=No, Thickness=0.057inch, Width=0.049inch
C22 C23: "CAP CER 15pF 50V C0G 0402", LCSC Part #=C86285, C=15pF
C28 C29 C30 C33 C34 C35: "CAP CER 2.2nF 10V X7R 0402", LCSC Part #=C541373, C=2.2nF
C38: library part CMP-05428-000400-1, "Conductive Polymer Aluminum Solid Capacitors (OS-CON) 470uF ±20% 6.3V RADIAL SMT 10x7.9mm", Capacitance=470uF, Case/Package=Radial, ESR (Equivalent Series Resistance)=20mR, Max Operating Temperature=105°C, Min Operating Temperature=-55°C, Package Quantity=500, Ripple Current=4.13A, Tolerance=20%, Voltage Rating=6.3V, Diameter=10mm, Dissipation Factor=12%, Height=10.3mm, Height - Seated (Max)=0.315inch, Lead Free="Lead Free", Length=7.9mm, Life (Hours)=2000Hour, Mount="Surface Mount", Packaging="Tape and Reel", Polarity=Polar, REACH SVHC="No SVHC", RoHS Compliant=Yes, Series="OS-CON, SVPA", Termination=SMD/SMT, Voltage Rating (DC)=6.3V, Width=10.3mm
C45: library part CMP-03913-54202488-3, "Alum. Electrolytic Cap 100UF 50V 10.5MMV-CHIP Wcap-asll, Lifetime 5000H +105OC", Capacitance=100µF, Case/Package=Radial, ESR (Equivalent Series Resistance)=227.529mΩ, Insulation Resistance=1MΩ, Leakage Current=50µA, Max Operating Temperature=105°C, Min Operating Temperature=-55°C, Ripple Current=350mA, Tolerance=20%, Voltage Rating=50V, Diameter=8mm, Height=10.5mm, Height - Seated (Max)=10.4902mm, Impedance=340mΩ, Length=10.5mm, Life (Hours)=5000hours, Mount="Surface Mount", Polarity=Polar, REACH SVHC=Unknown, Ripple Current (AC)=350mA, RoHS=Compliant, Voltage Rating (DC)=50V
D1: library part CMP-12225-000058-1, "TVS DIODE 5.25V 17V SOT666", Breakdown Voltage=6V, Capacitance=3.5pF, Case/Package=SOT-666, Clamping Voltage=17V, LCSC Part #=C7519, Leakage Current=150nA, Max Operating Temperature=125°C, Min Operating Temperature=-40°C, Operating Supply Voltage=5V, Package Quantity=1, Peak Pulse Current=5A, Power Line Protection=Yes, Test Current=1mA, Contact Plating=Tin, Depth=1.3mm, Direction=Unidirectional, Element Configuration=Dual, ESD Protection=Yes, Height=0.6mm, Lead Free="Lead Free", Length=1.7mm, Max Breakdown Voltage=6V, Max Reverse Leakage Current=150nA, Min Breakdown Voltage=6V, Mount="Surface Mount", Number of Bidirectional Channels=2, Number of Channels=2, Number of Elements=1, Number of Pins=6, Packaging="Tape and Reel", Polarity=Unidirectional, Radiation Hardening=No, REACH SVHC="No SVHC", Reverse Breakdown Voltage=6V, Reverse Standoff Voltage=5V, Termination=SMD/SMT, Width=1.3mm, Working Voltage=5V
D2 D3 D4 D5: library part CMP-00731-94024739-1, "LSM0603453V LED SM 0603 3V -/1000/-mcd Green", Case/Package=0603, Color=Green, Forward Current=20mA, Forward Voltage=2.3V, Max Operating Temperature=85°C, Min Operating Temperature=-40°C, Power Dissipation=60mW, Reverse Voltage=5V, Height=550µm, Luminous Intensity=120mcd, NexarPartId=94024739, Schedule B="8541402000, 8541406050", Viewing Angle=120°, Wavelength=576nm
J1: library part CMP-04767-000028-2, "CONN RCP USB2.0 TYP C 24P SMD RA", Current Rating=1.25A, LCSC Part #=C3197684, Max Operating Temperature=85°C, Min Operating Temperature=-40°C, Voltage Rating=30V, Contact Material="Gold, Nickel", Gender=Receptacle, Height=3.36mm, NexarPartId=117190526, Number of Contacts=16, USB Standard="USB 2.0"
J2: library part CMP-02766-000544-1, "Conn Unshrouded Header HDR 3 POS 2.54mm Solder ST Thru-Hole Bulk", Housing Color=Black, Max Current Rating=7.6A, Max Operating Temperature=125°C, Max Voltage Rating (AC)=550V, Min Operating Temperature=-55°C, Contact Material=Bronze, Contact Plating=Gold, Depth=2.54mm, Gender=Male, Housing Material=Polyester, Length=7.62mm, Number of Contacts=3, Number of Rows=1, Orientation=Straight, Packaging=Bulk, Pitch=2.54mm, REACH SVHC="No SVHC", Termination=Solder
J3: library part CMP-02360-000003-1, "CONN MICRO SD CARD PUSH-PULL R/A", Flammability Rating="UL94 V-0", Package Quantity=7500, Connector Type=Connector, Contact Material="Copper Alloy", Contact Plating=Gold, Depth=11.45mm, Gender=Receptacle, Height=1.55mm, Housing Material=Polymer, Lead Free="Lead Free", Length=15.6mm, Mount="Surface Mount", Number of Contacts=8, Number of Rows=1, Orientation="Right Angle", Packaging="Tape and Reel", Pitch=1.1mm, Radiation Hardening=No, Termination=SMD/SMT
J4 J5: "TERM BLK 2POS 5.08mm TH", LCSC Part #=C691860
J6 J7 J8 J9 J10 J11 J12 J13: library part CMP-1672-00008-3, "Phosphor Bronze Contact Miniature Silver Plated Surface Mount Test Points", China RoHS=Compliant, ComponentLink1Description="Manufacturer's Website", ComponentLink1URL=http://www.keyelco.com/, ComponentLink2Description="Datasheet URL", ComponentLink2URL=https://www.keyelco.com/product-pdf.cfm?p=1357, Contact Material=Silver, Contact Plating=Silver, Height=2.42mm, HelpURL=https://www.keyelco.com/product-pdf.cfm?p=1357, Lead Free="Lead Free", Lifecycle Status=Production, Material=Bronze, Mount="Surface Mount", Number of Contacts=1, Number of Pins=1, Packaging="Tape and Reel", REACH SVHC=Yes, RoHS=Compliant, Termination=SMD/SMT
L1: "3.3uH, 0806", Inductance=3.3uH, LCSC Part #=C42411119
L2: library part CMP-0227-00173-3, "Power-choke We-pd", Ambient Temperature Range High=85°C, Ambient Temperature Range Low=-40°C, Case Code (Imperial)=1210, Case Code (Metric)=3225, Case/Package=Nonstandard, Current Rating=1.8A, DC Resistance (DCR)=193mΩ, Inductance=220µH, Inductance Tolerance=20%, Max Operating Temperature=125°C, Saturation Current=2.2A, Self Resonant Frequency=2.2MHz, Series Resistance=300mΩ, Test Frequency=1kHz, Composition=Wirewound, Core Material=Ferrite, Depth=12mm, Height=10mm, Height - Seated (Max)=10.0076mm, Lead Free="Lead Free", Lead Pitch=7mm, Length=12mm, Max DC Current=1.8A, Min Operating Temperature=-40°C, Mount="Surface Mount", Number of Pins=2, RMS Current (Irms)=1.8A, RoHS=Compliant, Shielding=Shielded, Termination=SMD/SMT, Tolerance=20%, Weight=4.535924g, Width=12mm
Q1 Q2: library part CMP-83955-000006-1, "MOSFET N-CH 30V 5.7A SOT23", Case/Package=SOT-23, Continuous Drain Current (ID)=5.7A, Drain to Source Voltage (Vdss)=30V, Gate to Source Voltage (Vgs)=12V, Input Capacitance=630pF, Max Operating Temperature=150°C, Max Power Dissipation=1.4W, Min Operating Temperature=-55°C, Lead Free="Lead Free", Mount="Surface Mount", Number of Elements=1, Number of Pins=3, Packaging="Tape and Reel", Power Dissipation=1.4W, Radiation Hardening=No, Rds On Max=26.5mR
R1: library part FRC0402F33R0TS, "RES 33Ω ±1% 62.5mW 0402", LCSC Part #=C2906868, Datasheet=https://www.lcsc.com/datasheet/C2906868.pdf, R=33
R2 R3: LCSC Part #=C2909343, R=27
R4 R6 R7 R16 R17 R18 R19 R20 R21 R22 R23 R34 R38 R39: "RES 1kΩ ±1% 62.5mW 0402", LCSC Part #=C2906864, R=1k
R5 R35 R36: "RES 0Ω ±1% 1/16W 0402", LCSC Part #=C2906858, R=0R
R8 R9: "RES 5.1kΩ ±1% 62.5mW 0402", LCSC Part #=C2906874, R=5.1k
R10 R11: "RES 4.7kΩ ±1% 62.5mW 0402", LCSC Part #=C2906869, R=4.7k
R12 R14 R15 R37: "RES 10kΩ ±1% 62.5mW 0402", LCSC Part #=C2906861, R=10k
R13 R27 R28: "RES 33kΩ ±1% 62.5mW 0402", LCSC Part #=C2909350, R=33k
R24 R25: library part CMP-26527-001190-1, "RES 0.02 OHM 1% 1/8W 0603", Case Code (Imperial)=0603, Case Code (Metric)=1608, Max Operating Temperature=155°C, Max Power Dissipation=125mW, Min Operating Temperature=-55°C, Resistance=20mR, Resistor Type="Thick Film", Temperature Coefficient=300ppm/°C, Tolerance=1%, Case/Package=0603, Height=0.022inch, Lead Free="Lead Free", Length=0.063inch, Mount="Surface Mount", Number of Terminations=2, Packaging="Tape and Reel", RoHS Compliant=Yes, Series=CSR, Width=0.031inch
R26: "RES 100kΩ ±1% 62.5mW 0402", LCSC Part #=C2906859, R=100k
R29: "RES 22kΩ ±1% 62.5mW 0402", LCSC Part #=C2909337, R=22k
R30 R31 R32 R33: "RES 100Ω ±1% 62.5mW 0402", LCSC Part #=C2906860, R=100
SW1: library part CMP-011-00013-1, "Push Button", LCSC Part Number=C318884, Manufacturer Part Number=TS-1187A-B-A-B, Design Item ID="XKB Connection TS-1187A-B-A-B", Source=ECE362.SchLib
SW2: library part CMP-011-00013-1, "Push Button", LCSC Part #=C318884, Manufacturer Part Number=TS-1187A-B-A-B, Design Item ID="XKB Connection TS-1187A-B-A-B", Source=ECE362.SchLib
U1: library part CMP-054-000000-1, "RP2350B QFPN 80 pins", LCSC Part Number=C42415655, Design Item ID=RP2350B, Manufacturer Part Number=RP2350B, Source=ECE362.SchLib
U2: library part CMP-00619-80966617-1, "W25Q64JVZPIQ NOR Flash Serial (SPI, Dual SPI, Quad SPI) 3V/3.3V 64M-bit 8M x 8 6ns 8-Pin WSON EP T/R/Tray/Tube", Ambient Temperature Range High=85°C, Frequency=133MHz, LCSC Part #=C2940197, Max Supply Voltage=3.6V, Min Operating Temperature=-40°C, Min Supply Voltage=2.7V, Access Time=6ns, Datasheet=https://www.lcsc.com/datasheet/C2940197.pdf, Height=800µm, Interface=SPI, Max Operating Temperature=85°C, Memory Size=8MB, Memory Type=FLASH, NexarPartId=80966617, RoHS=Non-Compliant, Schedule B="8542320070, 8542320070"
U3: library part CMP-1679-00010-1, "Low-Dropout Positive Fixed Voltage Regulator, 1 A, 3.3 V Output Voltage, 0 to 125 degC, 4-Pin SOT-223 (318H-01), Pb-Free, Tape and Reel", Case Code (Imperial)=0603, Case Code (Metric)=1608, LCSC Part #=C26537, Max Operating Temperature="155 degC", Min Operating Temperature="-55 degC", Package Quantity=5000, Power Rating="100 mW", Resistance="220 kohm", Tolerance=1%, Type (Resistor)="Thick Film", Voltage Rating="75 V", Case\Package=0603, ComponentLink1Description="Manufacturer URL", ComponentLink1URL=http://www.onsemi.com/, ComponentLink2Description=Datasheet, ComponentLink2URL=http://www.onsemi.com/pub_link/Collateral/NCP1117-D.PDF, Datasheet=https://www.lcsc.com/product-detail/C26537.html?s_z=n_q_NCP1117ST33T3G, DatasheetVersion="Rev. 27, 09/2014", Height="0.45 mm", Length="1.55 mm", Mount="Surface Mount", PackageDescription="4-Pin Small Outline Transistor, Body 6.5 x 3.5 mm, Pitch 2.3 mm", PackageReference=SOT-223-4-318H-01_A, Packaging="Tape and Reel", Radiation Hardening=No, REACH SVHC=Unknown, RoHSCompliant=true, Weight="7.1E-05 oz", Width="0.85 mm"
U4: "-40℃~+125℃ SMBus ±0.25℃ SOP-8 Analog and Digital Output"
U5: "ECE 362 Keypad, cols are 6,7,8,9."
U6: "2.2 inch TFT SPI Display", Datasheet=https://www.lcdwiki.com/2.2inch_SPI_Module_ILI9341_SKU:MSP2202#Reference_Materials
U7 U8: library part CMP-04895-000140-1, "IC CURR SENSE 1 CIRCUIT SOT23-5", Case/Package=SOT-23-5, Input Bias Current=100nA, Input Offset Voltage (Vos)=100uV, LCSC Part #=C122882, Max Operating Temperature=125°C, Min Operating Temperature=-40°C, Operating Supply Current=260uA, -3db Bandwidth=350kHz, Mount="Surface Mount", Number of Circuits=1, Packaging="Tape and Reel", Slew Rate=2V/µs
U9 U10: library part CMP-04895-000186-1, "IC CMOS 1 CIRCUIT SC70-5", Input Bias Current=5pA, Input Offset Voltage (Vos)=400uV, Max Operating Temperature=125°C, Min Operating Temperature=-40°C, Operating Supply Current=60uA, Output Current per Channel=40mA, Gain Bandwidth Product=1MHz, Mount="Surface Mount", Number of Channels=1, Number of Circuits=1, Packaging="Tape and Reel", RoHS Compliant=Yes, Slew Rate=2V/µs
U11: library part CMP-1572-00010-2, "High-Frequency Sink Synchronous MOSFET Driver, 4 A, 4.5 to 8 V, -40 to 125 degC, 8-Pin VSON (DRB), RoHS, Tape and Reel", Package Reference=DRB0008A, PartNumber=TPS28225, Sink Current="4 A", Supply Voltage Max="8 V", Supply Voltage Min="4.5 V", Temperature Max="125 degC", Temperature Min="-40 degC", ComponentLink1Description="Manufacturer URL", ComponentLink1URL=http://www.ti.com/, ComponentLink2Description=Datasheet, ComponentLink2URL=http://www.ti.com/lit/ds/symlink/tps28225.pdf, ComponentLink3Description="Package Specification", ComponentLink3URL=http://www.ti.com/lit/ds/symlink/tpa6205a1.pdf, DatasheetVersion=SLUS710D, Mounting Technology="Surface Mount", PackageDescription="8-Pin Plastic Small Outline, Body 3 x 3 mm, Pitch 0.65 mm", PackageVersion="4203482-2/K, 06/2012", Packing="Tape and Reel", RoHS=TRUE
X1: library part ABM8-272-T3, "Ultra Miniature Ceramic SMD Crystal, 12MHz, 50 Ohm ESR, +/- 30ppm tolerance, 10pF load capacitance, Recommended for RP2350B", LCSC Part #=C20625731, Load Capacitance=10pF, Tolerance="+/- 30ppm", ESR=50R, Frequency=12MHz

## Via types
v1: diameter 0.55, hole 0.3, Top Layer to Bottom Layer, 248 vias

## Nets (pads, with @x,y where several pads share a name; then routed paths per layer and width w, separated by ;. In a path a pad name is that pad's centre, name@x,y a point inside that pad or via, vN(x,y) a via of type N, cw(c..) or ccw(c..) an arc to the next point about the centre after c; other vN are vias at no path point)
3.3V_AVDD: C17.2 R1.1 U1.61 | length 3.8
  Top Layer w0.203: R1.1@68.58,33.545 68.58,33.782 68.961,34.163 68.961,34.781 C17.2@69.105,34.925 70.104,34.925 70.358,35.179 71.124,35.179 U1.61@71.2,35.103
+1.1V: C12.2 C14.2 C15.2 C16.2 L1.1 U1.10 U1.32 U1.51 U1.65 | length 20.6
  Top Layer w0.152: U1.32@74.4,44.897 74.4,45.911 74.519,46.03 74.519,46.426 74.4,46.545 74.4,47.665 C15.2@74.295,47.77 74.948,47.77 75.258,48.08 v1(75.204,48.133) ; U1.10@79.897,39.8 83.125,39.8 C14.2@83.33,40.005 83.33,41.257 83.312,41.275 v1(82.931,41.275)
  Top Layer w0.203: v1(67.437,38.227) 67.165,38.499 C16.2@67.165,39.624 67.995,39.624 68.22,39.849 68.993,39.849 69.041,39.8 U1.51@70.103,39.8 ; U1.65@72.8,35.103 72.8,33.049 72.28,32.529 C12.2@72.28,32.385 ; v1(73.025,30.48) L1.1@72.12,30.48 72.12,31.353 72.263,31.496 72.263,32.368 C12.2@72.28,32.385 ; v1(73.025,32.131) 72.771,32.385 C12.2@72.28,32.385
+3.3V: C1.2 C2.2 C3.2 C4.2 C5.2 C7.2 C8.2 C9.2 C10.2 C11.2 C13.2 C19.1 C20.2 C24.2 C25.2 C26.2 C27.2 C31.2 C32.2 C46.1 C47.2 D5.2 J3.4 J11.1 R1.2 R10.2 R11.2 R12.2 R14.1 R15.2 R37.2 R39.2 U1.5 U1.15 U1.24 U1.29 U1.41 U1.50 U1.59 U1.60 U1.64 U1.68 U1.69 U1.76 U2.8 U3.2 U3.4 U4.8 U6.1 U6.8 U7.5 U8.5 U9.5 U10.5 | length 130.3
  Top Layer w0.152: U1.69@74.4,35.103 U1.68@74,35.103 74,34.331 74.218,34.113 74.218,33.965 74.498,33.685 74.646,33.685 75.184,33.147 77.452,33.147 C10.2@77.724,32.875 76.944,32.875 76.831,32.762 v1(76.831,32.258) ; v1(77.597,49.022) 77.597,47.643 C3.2@77.615,47.625 ; U1.5@79.897,37.8 82.088,37.8 82.423,37.465 C2.2@83.33,37.465 83.33,38.717 v1(83.312,38.735) ; U1.15@79.897,41.8 82.585,41.8 C1.2@83.33,42.545
  Top Layer w0.203: D5.2@60.579,57.596 v1(60.579,59.436) ; v1(65.024,37.846) 65.405,38.227 66.294,38.227 67.165,37.356 C7.2@67.165,36.83 68.199,36.83 68.429,36.6 U1.59@70.103,36.6 ; v1(65.786,41) 66.935,41 67.078,41.144 C5.2@67.183,41.039 67.927,41.039 68.326,40.64 68.326,40.386 68.512,40.2 U1.50@70.103,40.2 ; v1(66.167,33.655) 66.53,34.018 C8.2@66.53,34.925 66.548,34.943 66.548,35.814 66.675,35.941 67.945,35.941 68.204,36.2 U1.60@70.103,36.2 ; v1(66.294,46.609) 67.165,45.738 C4.2@67.165,45.085 68.453,45.085 68.961,44.577 68.961,43.942 69.103,43.8 U1.41@70.103,43.8 ; v1(68.58,31.369) R1.2@68.58,32.495 ; C13.2@72.28,33.655 72.28,34.18 72.39,34.29 72.39,35.093 U1.64@72.4,35.103 72.4,36.312 v1(72.39,36.322) ; U1.29@75.6,44.897 75.6,45.882 76.835,47.117 77.107,47.117 C3.2@77.615,47.625 ; U1.76@77.2,35.103 77.2,34.125 77.334,33.991 77.334,33.918 77.597,33.655 78.105,33.655 78.486,33.274 78.486,33.02 78.631,32.875 C9.2@79.375,32.875 79.375,33.765 79.223,33.917 v1(79.223,34.011) ; U1.24@77.6,44.897 77.597,44.894 77.597,44.45 77.851,44.196 79.393,44.196 C11.2@80.79,45.593 80.79,46.329 81.128,46.667 v1(81.128,46.761) ; U2.8@80.137,19.1 80.137,17.78 80.282,17.635 C20.2@80.282,16.764 80.282,15.258 v1(80.264,15.24) ; R37.2@82.965,26.035 82.965,26.958 v1(83.185,27.178) ; v1(83.058,44.192) 83.124,44.125 83.124,43.716 83.33,43.51 C1.2@83.33,42.545 ; v1(85.954,51.587) 86.048,51.587 86.294,51.833 R15.2@87.376,51.833
  Top Layer w0.254: v1(2.286,41.275) 3.066,40.495 C24.2@3.81,40.495 6.22,40.495 U4.8@6.35,40.625 ; v1(3.937,31.75) R11.2@5.19,31.75 ; v1(5.08,29.21) R10.2@6.46,29.21 ; v1(7.874,7.493) 7.892,7.475 C31.2@9.525,7.475 9.655,7.605 U9.5@12.235,7.605 ; R12.2@10.05,31.75 v1(11.303,31.75) ; U8.5@15.87,69.215 16.015,69.07 C26.2@18.415,69.07 19.921,69.07 v1(19.939,69.088) ; v1(20.828,57.404) 20.81,57.422 C32.2@20.81,59.055 20.825,59.04 U10.5@23.03,59.04 ; v1(32.766,6.35) C27.2@34.435,6.35 34.435,8.75 U7.5@34.29,8.895 ; v1(83.82,58.293) 84.291,57.822 C46.1@87.249,57.822 90.225,57.822 C47.2@90.297,57.894 ; v1(84.201,21.844) 84.183,21.826 C25.2@84.183,20.32 84.403,20.1 J3.4@87.65,20.1 ; v1(91.313,60.071) 90.297,59.055 C47.2@90.297,57.894 ; U6.1@93.345,58.42 90.823,58.42 C47.2@90.297,57.894 ; R39.2@95.25,8.78 v1(95.25,10.16) 96.901,10.16 97.155,10.414 97.155,11.32 R14.1@97.265,11.43
  Top Layer w1.27: v1(46.736,11.811) 46.773,11.774 C19.1@50.8,11.774 51.091,11.774 52.07,10.795 U3.2@54.635,10.795 ; J11.1@55.245,23.495 v1(59.182,23.495) ; U3.4@60.935,10.795 63.373,10.795
  other v1: 63.373,7.874 65.278,7.874 65.278,9.652 65.278,11.557 63.373,13.335 65.278,13.335
ADC2: C33.2 R32.2 U1.53 | length 12.7
  Top Layer w0.203: R32.2@58.31,40.64 59.89,40.64 C33.2@60,40.53 62.628,40.53 v1(62.738,40.64) ; v1(68.428,39.345) 68.494,39.279 68.925,39.279 69.215,38.989 70.092,38.989 U1.53@70.103,39
  Bottom Layer w0.203: v1(62.738,40.64) 62.882,40.496 65.577,40.496 65.995,40.496 66.138,40.64 67.133,40.64 v1(68.428,39.345)
ADC3: C29.2 R30.2 U1.54 | length 12.6
  Top Layer w0.203: R30.2@58.31,38.1 59.89,38.1 C29.2@60,37.99 62.628,37.99 v1(62.738,38.1) ; v1(68.707,38.354) 68.961,38.354 69.215,38.608 70.095,38.608 U1.54@70.103,38.6
  Bottom Layer w0.203: v1(62.738,38.1) 64.439,38.1 65.328,38.989 68.072,38.989 v1(68.707,38.354)
ADC3_X: R30.1 U9.3 U9.4 | length 65.4
  Top Layer w0.254: U9.4@12.235,8.905 U9.3@14.435,8.905 16.452,10.922 v1(22.225,10.922)
  Top Layer w0.35: v1(53.721,37.465) 55.372,37.465 56.007,38.1 R30.1@57.26,38.1
  Bottom Layer w0.35: v1(22.225,10.922) 37.846,10.922 50.038,23.114 53.34,23.114 53.848,23.622 53.848,37.338 v1(53.721,37.465)